# Altium PCB PCB1.PcbDoc
Units mil, origin at the board's own origin, x right, y up, seen from the top; angles counter-clockwise.
Board outline 2700 x 1825 mil, 2 copper layers (Top Layer, Bottom Layer); 11 components, 34 nets, 100 pads, 158 vias.
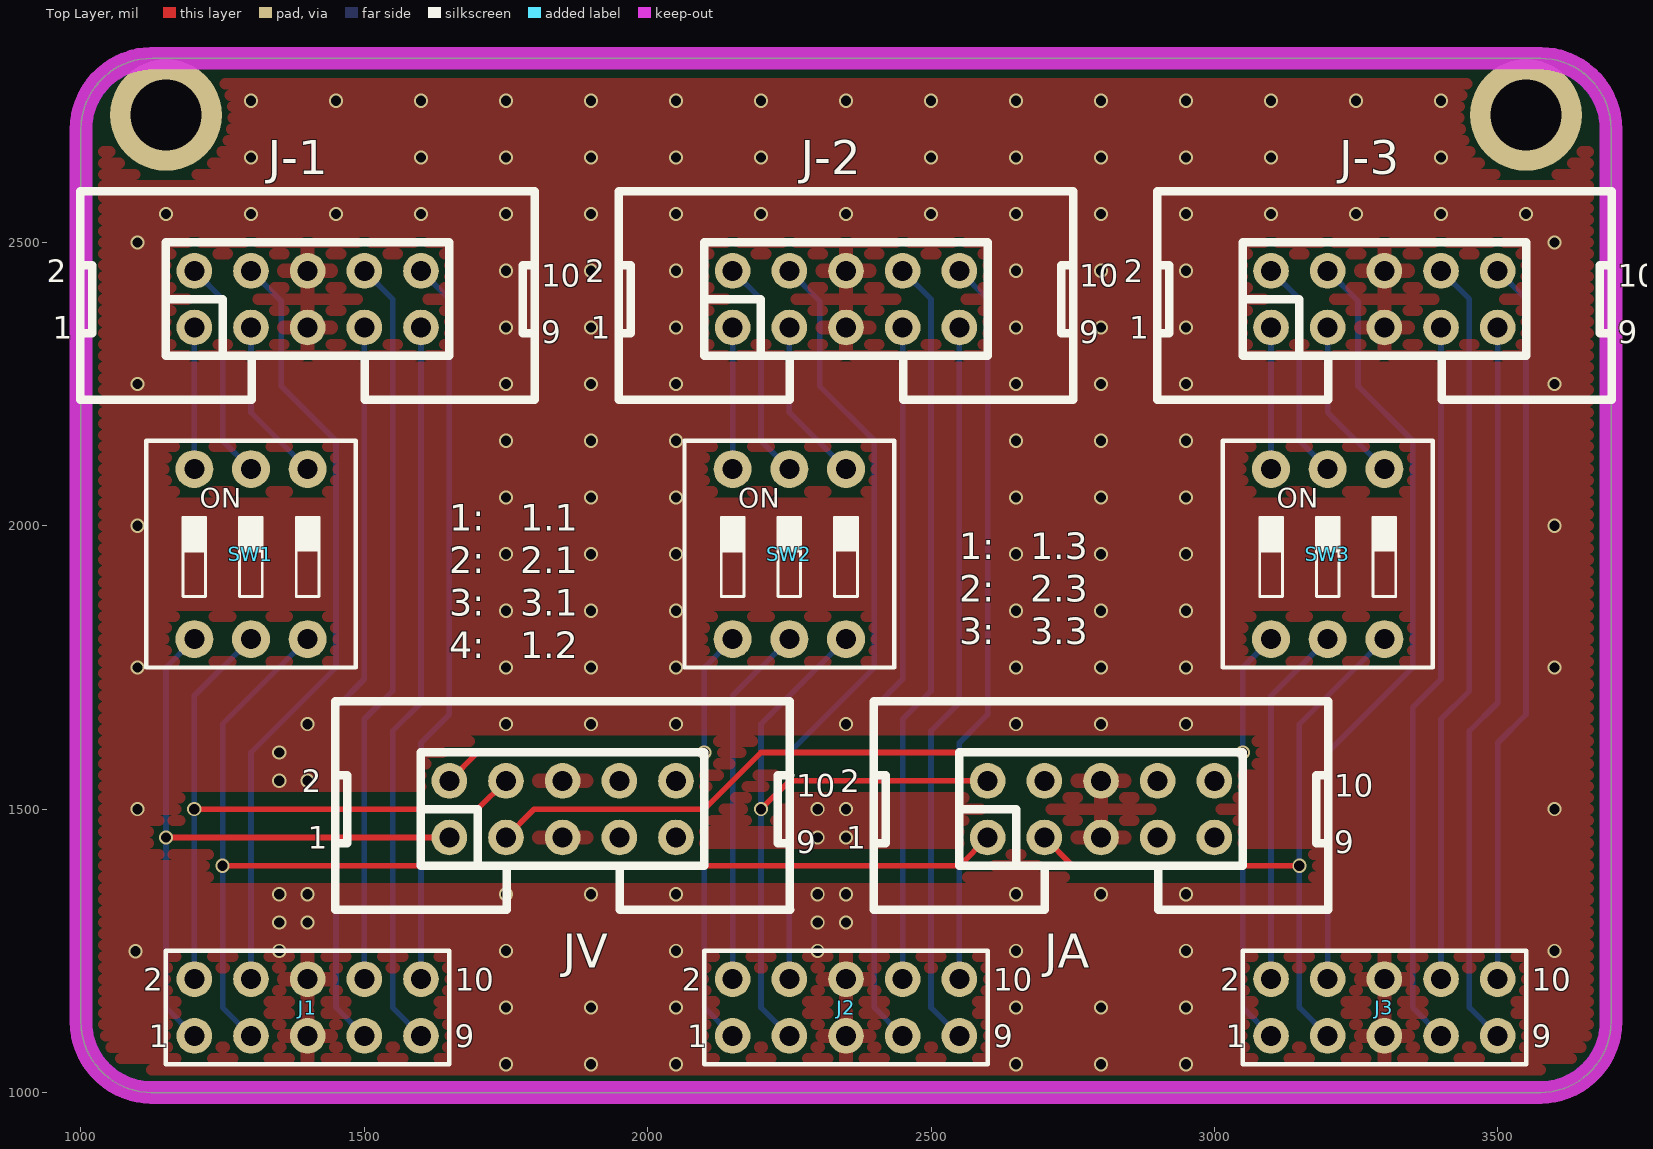
[diagram p0: Top Layer view]
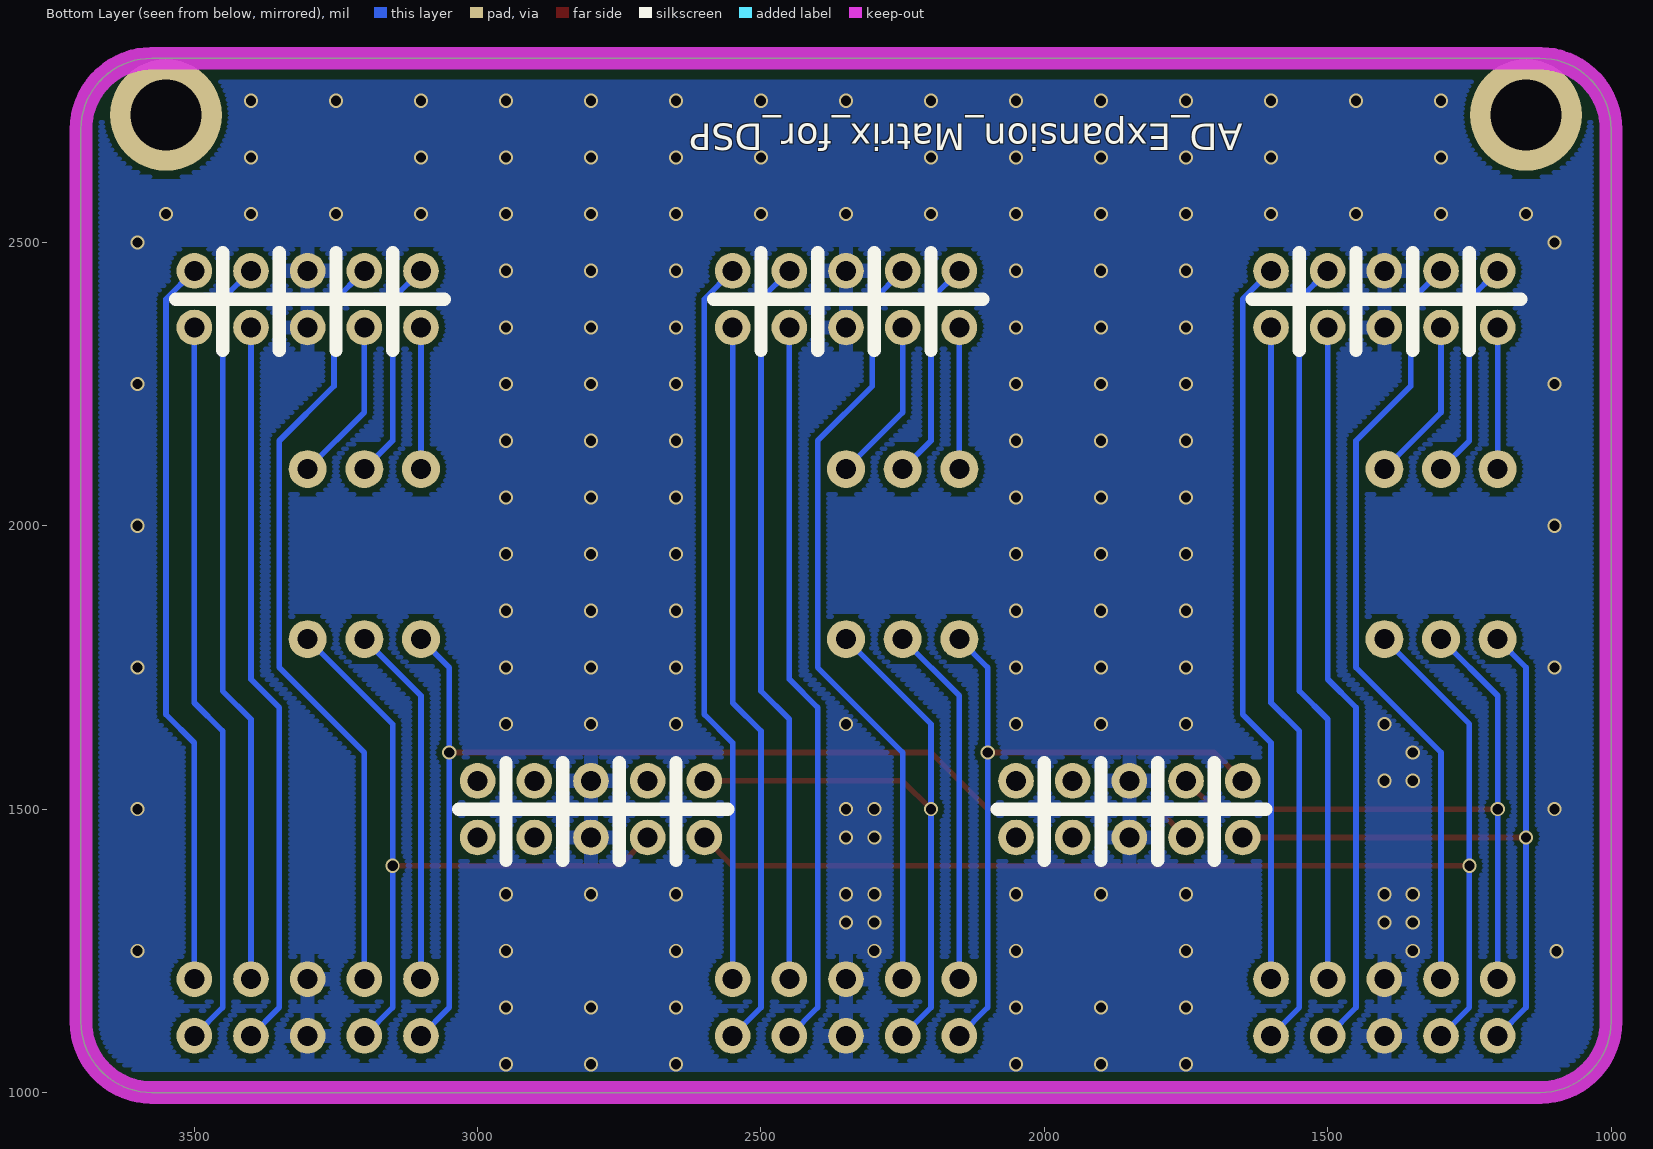
[diagram p1: Bottom Layer view, seen from below]

## Layer stack, top to bottom
Top Solder: solder mask 0.4, Solder Resist, Dk 3.5
Top Layer: signal copper 1.4
Dielectric 1: dielectric 12.6, FR-4, Dk 4.8
Bottom Layer: signal copper 1.4
Bottom Solder: solder mask 0.4, Solder Resist, Dk 3.5

## Board outline
1125,1000 cw(c1125,1125) 1000,1125 1000,2699.61 cw(c1125.39,2699.61) 1125.39,2825 3575,2825 cw(c3575,2700) 3700,2700 3700,1125 cw(c3575,1125) 3575,1000

## Design rules (kind name [scope] priority, off if disabled: settings)
Clearance [All] p1: gap=10 ignorepadtopadclearanceinfootprint=FALSE except(0: Arc-Hole Track-Hole SMDPad-Hole THPad-Hole Via-Hole Fill-Hole Poly-Hole Region-Hole Text-Hole)
PolygonConnect [All] p1: thpad.connectstyle=Relief thpad.reliefconductorwidth=25 thpad.reliefentries=4 thpad.polygonreliefangle="90 Angle" thpad.airgapwidth=10 smdpad.connectstyle=Relief smdpad.reliefconductorwidth=10 smdpad.reliefentries=4 smdpad.polygonreliefangle="90 Angle" smdpad.airgapwidth=10 via.connectstyle=Direct via.reliefconductorwidth=10 via.reliefentries=4 via.polygonreliefangle="90 Angle" via.airgapwidth=10
RoutingVias [All] p1: holewidth=28 width=50 viastyle="Through Hole" minholewidth=28 minwidth=50 maxholewidth=28 maxwidth=50
SolderMaskExpansion [All] p1: expansion=4 istentingtop=FALSE
Width [All] p1: maxlimit=10 minlimit=10 preferedwidth=10
30 further rules are at their usual default settings.

## Components (designator, comment, footprint, x,y, rotation, side; value= is the part's Value field where it differs from the comment)
J1 "Header 5X2" HDR2.54-LI-2x5P 1400,1150 r0 top
J2 "Header 5X2" HDR2.54-LI-2x5P 2350,1150 r0 top
J3 "Header 5X2" HDR2.54-LI-2x5P 3300,1150 r0 top
J-1 "Header 5X2" IDC2.54-LI-2x5P 1200,2350 r0 top
J-2 "Header 5X2" IDC2.54-LI-2x5P 2150,2350 r0 top
J-3 "Header 5X2" IDC2.54-LI-2x5P 3100,2350 r0 top
JA "Header 5X2" IDC2.54-LI-2x5P 2600,1450 r0 top (schematic designator J5)
JV "Header 5X2" IDC2.54-LI-2x5P 1650,1450 r0 top (schematic designator J4)
SW1 "SW-3P" "CSW DIP-3P" 1300,1950 r0 top
SW2 "SW-3P" "CSW DIP-3P" 2250,1950 r0 top
SW3 "SW-3P" "CSW DIP-3P" 3200,1950 r0 top

## Footprints (in the part's own frame and the unit in brackets; to place one, negate y for a bottom-side part, rotate by r counter-clockwise, add the part's x,y. Pads: shape width x height; smd on the part's side, far side on the other; paste and mask are expansions set on the pad)
"CSW DIP-3P" [mm] "9.2*9.9*7mm"
  round 1.7 hole 0.9: 1(-2.54,-3.81) 2(0,-3.81) 3(2.54,-3.81) 4(2.54,3.81) 5(0,3.81) 6(-2.54,3.81)
  silkscreen extent -4.7,-5.08 4.7,5.08, body extent -4.59,-4.95 4.59,4.95, height 6.65
HDR2.54-LI-2x5P [mm] "双排排针，5x2脚"
  round 1.6 hole 0.9: 1(-5.08,-1.27) 2(-5.08,1.27) 3(-2.54,-1.27) 4(-2.54,1.27) 5(0,-1.27) 6(0,1.27) 7(2.54,-1.27) 8(2.54,1.27) 9(5.08,-1.27) 10(5.08,1.27)
  silkscreen extent -6.35,-2.54 6.35,2.54, body extent -6.35,-2.54 6.35,2.54, height 8.5
IDC2.54-LI-2x5P [mm] "10P简易牛角座"
  round 1.6 hole 0.9: 1(0,0) 2(0,2.54) 3(2.54,0) 4(2.54,2.54) 5(5.08,0) 6(5.08,2.54) 7(7.62,0) 8(7.62,2.54) 9(10.16,0) 10(10.16,2.54)
  silkscreen extent -5.11,-3.23 15.27,6.1, body extent -5.08,-3.08 15.24,5.77, height 9.17

## Part data
J1 J2 J3 J-1 J-2 J-3 JA JV: "5*2P接插件", BOM名称=5*2P接插件, 下单链接=https://item.taobao.com/item.htm?ft=t&id=613637044352, 淘宝ID=小糖豆的小窝窝
SW1 SW2 SW3: "3路编码开关", BOM名称=3路编码开关, 下单链接=https://item.taobao.com/item.htm?ft=t&id=613637044352, 淘宝ID=小糖豆的小窝窝

## Free pads (board coordinates)
  round 196.85 hole 125.98: Q(1150,2725) Q(3550,2725)

## Via types
v1: diameter 25, hole 18, Top Layer to Bottom Layer, tented both sides, 151 vias
v2: diameter 25, hole 18, Top Layer to Bottom Layer, tented bottom, 7 vias

## Nets (pads, with @x,y where several pads share a name; then routed paths per layer and width w, separated by ;. In a path a pad name is that pad's centre, name@x,y a point inside that pad or via, vN(x,y) a via of type N, cw(c..) or ccw(c..) an arc to the next point about the centre after c; other vN are vias at no path point)
1.1: J-1.1 SW1.6 | length 250
  Bottom Layer w10: SW1.6 J-1.1
1.2: J-1.2 SW1.5 | length 391.4
  Bottom Layer w10: J-1.2 1250,2400 1250,2150 SW1.5
1.3: J-1.3 SW1.4 | length 291.4
  Bottom Layer w10: J-1.3 1300,2200 SW1.4
2.1: J-2.1 SW2.6 | length 250
  Bottom Layer w10: SW2.6 J-2.1
2.2: J-2.2 SW2.5 | length 391.4
  Bottom Layer w10: J-2.2 2200,2400 2200,2150 SW2.5
2.3: J-2.3 SW2.4 | length 291.4
  Bottom Layer w10: J-2.3 2250,2200 SW2.4
3.1: J-3.1 SW3.6 | length 250
  Bottom Layer w10: SW3.6 J-3.1
3.2: J-3.2 SW3.5 | length 391.4
  Bottom Layer w10: J-3.2 3150,2400 3150,2150 SW3.5
3.3: J-3.3 SW3.4 | length 291.4
  Bottom Layer w10: J-3.3 3200,2200 SW3.4
GND: J1.5 J1.6 J2.5 J2.6 J3.5 J3.6 J-1.5 J-1.6 J-2.5 J-2.6 J-3.5 J-3.6 JA.5 JA.6 JV.5 JV.6
  other v1: 1750,1050 1900,1050 2050,1050 2650,1050 2800,1050 2950,1050 1750,1150 1900,1150 2050,1150 2650,1150 2800,1150 2950,1150 1096.25,1249.4 1350,1250 1750,1250 2050,1250 2300,1250 2650,1250 2950,1250 3600,1250 1350,1300 1400,1300 2300,1300 2350,1300 1350,1350 1400,1350 1750,1350 1900,1350 2050,1350 2300,1350 2350,1350 2650,1350 2800,1350 2950,1350 2300,1450 2350,1450 1100,1500 2300,1500 2350,1500 3600,1500 1350,1550 1400,1550 1350,1600 1400,1650 1750,1650 1900,1650 2050,1650 2350,1650 2650,1650 2800,1650 2950,1650 1100,1750 1750,1750 1900,1750 2050,1750 2650,1750 2800,1750 2950,1750 3600,1750 1750,1850 1900,1850 2050,1850 2650,1850 2800,1850 2950,1850 1750,1950 1900,1950 2050,1950 2650,1950 2800,1950 2950,1950 1100,2000 3600,2000 1750,2050 1900,2050 2050,2050 2650,2050 2800,2050 2950,2050 1750,2150 1900,2150 2050,2150 2650,2150 2800,2150 2950,2150 1100,2250 1750,2250 1900,2250 2050,2250 2650,2250 2800,2250 2950,2250 3600,2250 1750,2350 1900,2350 2050,2350 2650,2350 2800,2350 2950,2350 1750,2450 1900,2450 2050,2450 2650,2450 2800,2450 2950,2450 1100,2500 3600,2500 1150,2550 1300,2550 1450,2550 1600,2550 1750,2550 1900,2550 2050,2550 2200,2550 2350,2550 2500,2550 2650,2550 2800,2550 2950,2550 3100,2550 3250,2550 3400,2550 3550,2550 1300,2650 1600,2650 1750,2650 1900,2650 2050,2650 2200,2650 2500,2650 2650,2650 2800,2650 2950,2650 3100,2650 3400,2650 1300,2750 1450,2750 1600,2750 1750,2750 1900,2750 2050,2750 2200,2750 2350,2750 2500,2750 2650,2750 2800,2750 2950,2750 3100,2750 3250,2750 3400,2750
UD1.1: J1.1 JV.1 SW1.1 | length 1241.4
  Top Layer w10: v2(1150,1450) JV.1
  Bottom Layer w10: J1.1 1150,1150 v2(1150,1450) 1150,1750 SW1.1
UD1.2: J1.2 JV.4 SW1.2 | length 1212.1
  Top Layer w10: v2(1200,1500) 1700,1500 JV.4
  Bottom Layer w10: J1.2 v2(1200,1500) 1200,1700 SW1.2
UD1.3: J1.3 JA.1 SW1.3 | length 2153.6
  Top Layer w10: v2(1250,1400) 2550,1400 JA.1
  Bottom Layer w10: J1.3 1250,1150 v2(1250,1400) 1250,1650 SW1.3
UD1.4: J1.4 J-1.4 | length 1374.3
  Bottom Layer w10: J1.4 1300,1600 1450,1750 1450,2150 1353.5,2246.5 1353.5,2396.5 J-1.4
UD1.5: J1.7 J-1.7 | length 1291.4
  Bottom Layer w10: J1.7 1450,1150 1450,1679.29 1500,1729.29 J-1.7
UD1.6: J1.8 J-1.8 | length 1291.4
  Bottom Layer w10: J1.8 1500,1658.58 1550,1708.58 1550,2400 J-1.8
UD1.7: J1.9 J-1.9 | length 1291.4
  Bottom Layer w10: J1.9 1550,1150 1550,1637.87 1600,1687.87 J-1.9
UD1.8: J1.10 J-1.10 | length 1291.4
  Bottom Layer w10: J1.10 1600,1617.16 1650,1667.16 1650,2400 J-1.10
UD2.1: J2.1 JV.2 SW2.1 | length 1212.1
  Top Layer w10: JV.2 1700,1600 v2(2100,1600)
  Bottom Layer w10: J2.1 2100,1150 v2(2100,1600) 2100,1750 SW2.1
UD2.2: J2.2 SW2.2 | length 641.4
  Bottom Layer w10: J2.2 2150,1700 SW2.2
UD2.3: J2.3 JA.2 SW2.3 | length 1203.6
  Top Layer w10: v2(2200,1500) 2250,1550 JA.2
  Bottom Layer w10: J2.3 2200,1150 v2(2200,1500) 2200,1650 SW2.3
UD2.4: J2.4 J-2.4 | length 1374.3
  Bottom Layer w10: J2.4 2250,1600 2400,1750 2400,2150 2303.5,2246.5 2303.5,2396.5 J-2.4
UD2.5: J2.7 J-2.7 | length 1291.4
  Bottom Layer w10: J2.7 2400,1150 2400,1679.29 2450,1729.29 J-2.7
UD2.6: J2.8 J-2.8 | length 1291.4
  Bottom Layer w10: J2.8 2450,1658.58 2500,1708.58 2500,2400 J-2.8
UD2.7: J2.9 J-2.9 | length 1291.4
  Bottom Layer w10: J2.9 2500,1150 2500,1637.87 2550,1687.87 J-2.9
UD2.8: J2.10 J-2.10 | length 1291.4
  Bottom Layer w10: J2.10 2550,1617.16 2600,1667.16 2600,2400 J-2.10
UD3.1: J3.1 JV.3 SW3.1 | length 2103.6
  Top Layer w10: JV.3 1800,1500 2100,1500 2200,1600 v2(3050,1600)
  Bottom Layer w10: J3.1 3050,1150 v2(3050,1600) 3050,1750 SW3.1
UD3.2: J3.2 SW3.2 | length 641.4
  Bottom Layer w10: J3.2 3100,1700 SW3.2
UD3.3: J3.3 JA.3 SW3.3 | length 1253.6
  Top Layer w10: JA.3 2750,1400 v2(3150,1400)
  Bottom Layer w10: J3.3 3150,1150 v2(3150,1400) 3150,1650 SW3.3
UD3.4: J3.4 J-3.4 | length 1374.3
  Bottom Layer w10: J3.4 3200,1600 3350,1750 3350,2150 3253.5,2246.5 3253.5,2396.5 J-3.4
UD3.5: J3.7 J-3.7 | length 1291.4
  Bottom Layer w10: J3.7 3350,1150 3350,1679.29 3400,1729.29 J-3.7
UD3.6: J3.8 J-3.8 | length 1291.4
  Bottom Layer w10: J3.8 3400,1658.58 3450,1708.58 3450,2400 J-3.8
UD3.7: J3.9 J-3.9 | length 1291.4
  Bottom Layer w10: J3.9 3450,1150 3450,1637.87 3500,1687.87 J-3.9
UD3.8: J3.10 J-3.10 | length 1291.4
  Bottom Layer w10: J3.10 3500,1617.16 3550,1667.16 3550,2400 J-3.10
pads on no net: JA.4 JA.7 JA.8 JA.9 JA.10 JV.7 JV.8 JV.9 JV.10

## Polygon pours and split planes (outlines as drawn)
GND on Bottom Layer "NONET_L02_P-001" (hatched Horizontal grid 8 track 8, remove dead copper, pour order 0): 850,3025 1075,3250 4300,3250 4300,750 4125,575 4075,625 0,625 0,2500 450,2950
GND on Top Layer "NONET_L02_P-001" (hatched Horizontal grid 20 track 20, remove dead copper, pour order 1): 1200,725 4300,725 4300,3750 4200,3850 3800,3450 750,3450 750,900 725,875

## Keep-outs
Keep-Out Layer:
  the board outline again, w40

## Silkscreen, mask and mechanical layers (free items; w line width, h text height)
Top Overlay:
  text "1:" at 1650,1975 h80
  text "1.1" at 1775,1975 h80
  text "1:" at 2550,1925 h80
  text "1.3" at 2675,1925 h80
  text "2:" at 1650,1900 h80
  text "2.1" at 1775,1900 h80
  text "2:" at 2550,1850 h80
  text "2.3" at 2675,1850 h80
  text "3:" at 1650,1825 h80
  text "3.1" at 1775,1825 h80
  text "3:" at 2550,1775 h80
  text "3.3" at 2675,1775 h80
  text "4:" at 1650,1750 h80
  text "1.2" at 1775,1750 h80
Bottom Overlay:
  text "AD_Expansion_Matrix_for_DSP" at 1650,2725 h80 r180
Mechanical 1:
  lines w5: 997.5,2699.61 cw(c1125.39,2699.61) 1125.39,2827.5 ; 997.5,2699.61 ccw(c1000,2699.61) 997.5,2699.58 ; 997.5,2699.61 ccw(c1000,2699.61) 997.5,2699.58 ; 997.5,2699.58 997.5,2699.61 ; 997.5,2699.58 997.5,1125 ccw(c1125,1125) 1125,997.5 3575,997.5 ccw(c3575,1125) 3702.5,1125 3702.5,2700 ccw(c3575,2700) 3575,2827.5 1125.44,2827.5 ; 1125.39,2827.5 cw(c1125.39,2825) 1125.44,2827.5 ; 1125.39,2827.5 cw(c1125.39,2825) 1125.44,2827.5 ; 1125.39,2827.5 1125.44,2827.5

## Text inside footprints (layer, text, board x,y; h text height)
J1: Top Overlay "2" at 1110,1180 h40; Top Overlay "1" at 1120,1080 h40; Top Overlay "9" at 1660,1080 h40; Top Overlay "10" at 1660,1180 h40
J2: Top Overlay "2" at 2060,1180 h40; Top Overlay "1" at 2070,1080 h40; Top Overlay "9" at 2610,1080 h40; Top Overlay "10" at 2610,1180 h40
J3: Top Overlay "2" at 3010,1180 h40; Top Overlay "1" at 3020,1080 h40; Top Overlay "9" at 3560,1080 h40; Top Overlay "10" at 3560,1180 h40
J-1: Top Overlay "10" at 1812,2422 h40; Top Overlay "9" at 1812,2322 h40; Top Overlay "1" at 950,2330 h40; Top Overlay "2" at 940,2430 h40
J-2: Top Overlay "10" at 2762,2422 h40; Top Overlay "9" at 2762,2322 h40; Top Overlay "1" at 1900,2330 h40; Top Overlay "2" at 1890,2430 h40
J-3: Top Overlay "10" at 3712,2422 h40; Top Overlay "9" at 3712,2322 h40; Top Overlay "1" at 2850,2330 h40; Top Overlay "2" at 2840,2430 h40
JA: Top Overlay "10" at 3212,1522 h40; Top Overlay "9" at 3212,1422 h40; Top Overlay "1" at 2350,1430 h40; Top Overlay "2" at 2340,1530 h40
JV: Top Overlay "10" at 2262,1522 h40; Top Overlay "9" at 2262,1422 h40; Top Overlay "1" at 1400,1430 h40; Top Overlay "2" at 1390,1530 h40
SW1: Top Overlay "ON" at 1210,2020 h60
SW2: Top Overlay "ON" at 2160,2020 h60
SW3: Top Overlay "ON" at 3110,2020 h60